# Altium PCB IOT_Buttons.PcbDoc (part 2 of 2)
Units mil, origin at the board's own origin, x right, y up, seen from the top; angles counter-clockwise.
Board outline 2799.91 x 2755.91 mil, 2 copper layers (Top Layer, Bottom Layer), stack 57 mil thick; 76 components, 42 nets, 270 pads, 220 vias.
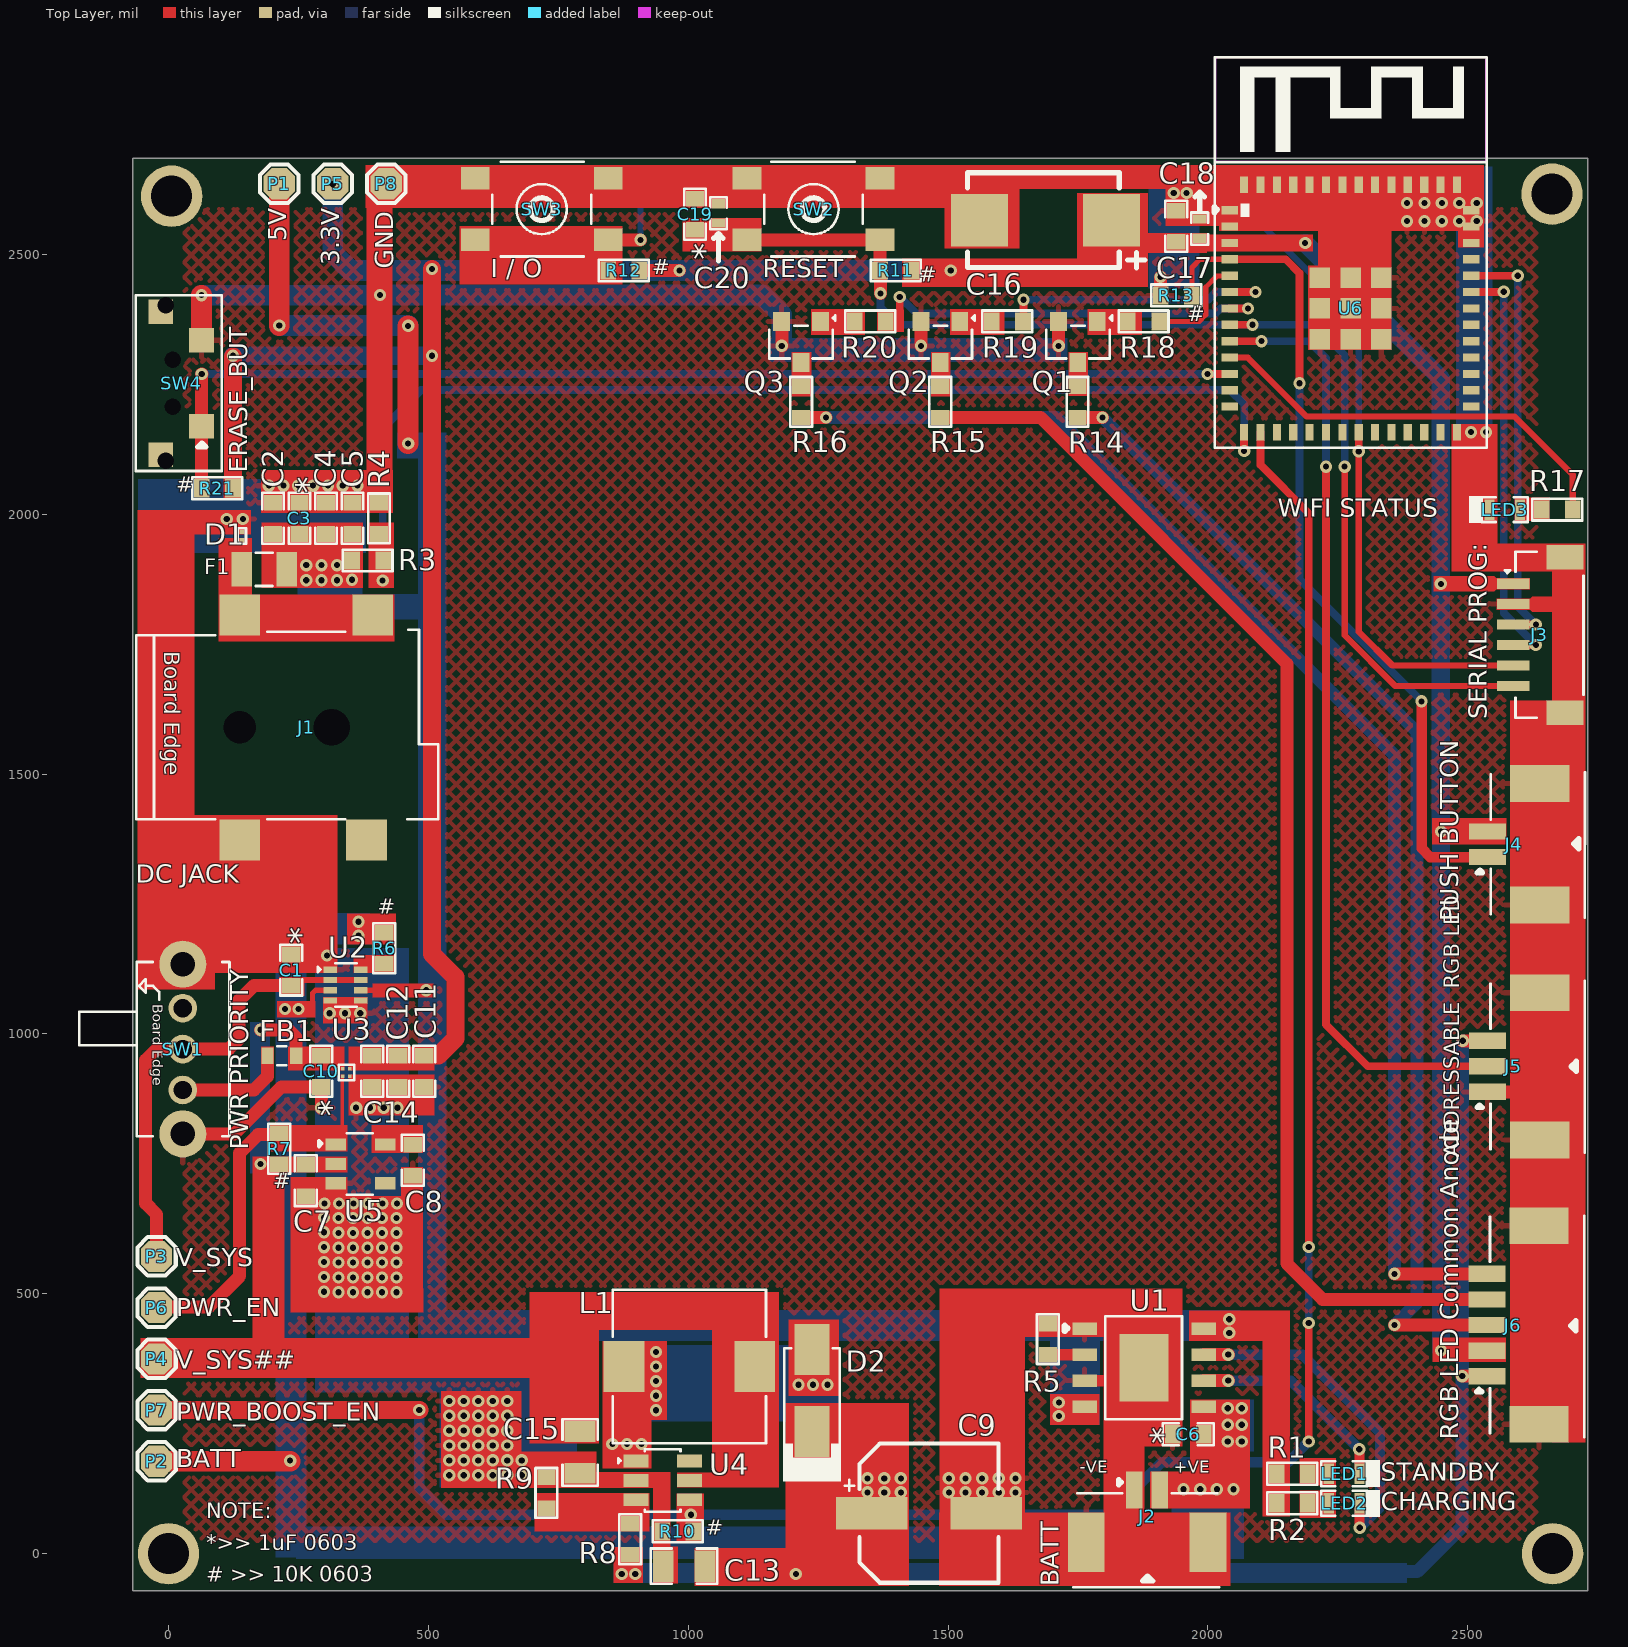
[diagram p0: Top Layer view]

## Part data (continued)
R8: library part RT0603BRD0762KL, "RES SMD 62K OHM 0.1% 1/10W 0603", Case Code (Imperial)=0603, Case Code (Metric)=1608, LCSC Part Number=C136961, Manufacturer=Yageo, Max Operating Temperature=125°C, Max Power Dissipation=100mW, Min Operating Temperature=-55°C, Package Quantity=5000, Resistance=62kR, Resistor Type="Thin Film", Supplier Part Number 1=YAG1707CT-ND, Temperature Coefficient=25ppm/°C, Tolerance=0.1%, Voltage Rating=75V, Voltage Rating (DC)=50V, Case/Package=0603, Category="Chip SMD Resistors", ComponentLink1Description=https://datasheet.ciiva.com/8888/pyu-rt-1-to-0-05-rohs-l-4-8888573.pdf?src-supplier=Avnet, ComponentLink1URL=https://datasheet.ciiva.com/8888/pyu-rt-1-to-0-05-rohs-l-4-8888573.pdf?src-supplier=Avnet, ComponentLink2Description=https://datasheet.ciiva.com/2586/pyu-rt-1-to-0-05-rohs-l-4-2586028.pdf?src-supplier=Digi-Key, ComponentLink2URL=https://datasheet.ciiva.com/2586/pyu-rt-1-to-0-05-rohs-l-4-2586028.pdf?src-supplier=Digi-Key, ComponentLink3Description=https://datasheet.ciiva.com/46635/pyu-rt-1-to-0-05-rohs-l-5-46635035.pdf?src-supplier=Digi-Key, ComponentLink3URL=https://datasheet.ciiva.com/46635/pyu-rt-1-to-0-05-rohs-l-5-46635035.pdf?src-supplier=Digi-Key, Construction=Rectangular, Contact Plating=Tin,Matte, Depth=0.8mm, Features="Moisture Resistant", Height=0.022inch, Item Type=Resistor, Lead Free="Lead Free", Length=1.6mm, Manufacturer Part Number=RT0603BRD0762KL, Military Standard=Not, Number of Terminations=2, Packaging="Tape and Reel", Power Rating=100mW, Pricing 1="1=0.34000, 10=0.28800, 100=0.11260, 500=0.06812, 1000=0.04716, 2500=0.04322 (USD)", Radiation Hardening=No, RoHS=Yes, RoHS Compliant=Yes, Series=RT, Stock 1=20000, Supplier 1=Digi-Key, Termination=SMD/SMT, Weight=7.1E-05oz, Width=0.8mm
R9: library part RT0603BRD073K16L, "RES SMD 3.16KOHM 0.1% 1/10W 0603", Case Code (Imperial)=0603, Case Code (Metric)=1608, LCSC Part Number=C861373, Manufacturer=Yageo, Max Operating Temperature=125°C, Max Power Dissipation=100mW, Min Operating Temperature=-55°C, Package Quantity=5000, Resistance=3.16kR, Resistor Type="Thin Film", Temperature Coefficient=25ppm/°C, Tolerance=0.1%, Voltage Rating=75V, Voltage Rating (DC)=50V, Case/Package=0603, Category="Chip SMD Resistors", ComponentLink1Description=https://datasheet.ciiva.com/2585/pyu-rt-1-to-0-05-rohs-l-5-2585923.pdf?src-supplier=Digi-Key, ComponentLink1URL=https://datasheet.ciiva.com/2585/pyu-rt-1-to-0-05-rohs-l-5-2585923.pdf?src-supplier=Digi-Key, Construction=Rectangular, Depth=0.8mm, Height=0.022inch, Item Type=Resistor, Lead Free="Lead Free", Length=0.063inch, Manufacturer Part Number=RT0603BRD073K16L, Military Standard=Not, Number of Terminations=2, Packaging="Tape and Reel", Power Rating=100mW, Pricing 1="1=0.31330, 10=0.25380, 25=0.25120, 100=0.09580, 250=0.09480, 500=0.09380, 1000=0.05630, 3000=0.03310 (USD)", RoHS=Yes, RoHS Compliant=Yes, Series=RT, Stock 1=4487, Supplier 1="Arrow Electronics", Supplier Part Number 1=RT0603BRD073K16L, Termination=SMD/SMT, Width=0.031inch
R14 R15 R16: library part RC0603JR-070RL, "RES 0 OHM JUMPER 1/10W 0603", Case Code (Imperial)=0603, Case Code (Metric)=1608, LCSC Part Number=C95177, Manufacturer=Yageo, Max Operating Temperature=155°C, Max Power Dissipation=100mW, Min Operating Temperature=-55°C, Package Quantity=5000, Resistance=0mR, Resistance Tolerance=5%, Resistor Type="Thick Film", Supplier Part Number 1=311-0.0GRCT-ND, Temperature Coefficient=200ppm/°C, Tolerance=1%, Voltage Rating=50V, Case/Package=0603, Category="Chip SMD Resistors", Construction=Rectangular, Contact Plating=Tin,Matte, Depth=0.8mm, Features="Moisture Resistant", Height=0.45mm, Item Type=Resistor, Lead Free="Lead Free", Length=1.6mm, Manufacturer Part Number=RC0603JR-070RL, Military Standard=Not, Number of Pins=2, Number of Terminations=2, Packaging="Tape and Reel", Power Rating=100mW, Pricing 1="1=0.10000, 10=0.01700, 25=0.01240, 50=0.00960, 100=0.00700, 250=0.00536, 500=0.00430, 1000=0.00316 (USD)", Radiation Hardening=No, Reach SVHC Compliant="No SVHC", RoHS=Yes, RoHS Compliant=Yes, Series=RC, Size Code=0603, Stock 1=18081776, Supplier 1=Digi-Key, Technology="THICK FILM", Termination=SMD/SMT, Voltage Rating (DC)=50V, Width=0.8mm
R17: library part RC0603FR-0751RL, "RES SMD 51R 100mW 0603", Case Code (Imperial)=0603, Case Code (Metric)=1608, LCSC Part Number=C114628, Manufacturer=Yageo, Max Operating Temperature=155°C, Max Power Dissipation=100mW, Min Operating Temperature=-55°C, Package Quantity=1, Resistance Tolerance=1%, Resistor Type="Thick Film", Temperature Coefficient=100ppm/°C, Voltage Rating=75V, Voltage Rating (DC)=50V, Case/Package=0603, Category="Chip SMD Resistors", ComponentLink1Description=https://datasheet.ciiva.com/11808/0900766b80f96399-11808142.pdf?src-supplier=RSComponents, ComponentLink1URL=https://datasheet.ciiva.com/11808/0900766b80f96399-11808142.pdf?src-supplier=RSComponents, ComponentLink2Description=https://datasheet.ciiva.com/46395/443971-46395015.pdf?src-supplier=Element14, ComponentLink2URL=https://datasheet.ciiva.com/46395/443971-46395015.pdf?src-supplier=Element14, ComponentLink3Description=https://datasheet.ciiva.com/2454/pyu-r-int-thick-7-2454445.pdf?src-supplier=Digi-Key, ComponentLink3URL=https://datasheet.ciiva.com/2454/pyu-r-int-thick-7-2454445.pdf?src-supplier=Digi-Key, ComponentLink4Description=https://datasheet.ciiva.com/2454/pyu-r-int-thick-7-2454446.pdf?src-supplier=Digi-Key, ComponentLink4URL=https://datasheet.ciiva.com/2454/pyu-r-int-thick-7-2454446.pdf?src-supplier=Digi-Key, ComponentLink5Description=https://datasheet.ciiva.com/2454/pyu-r-int-thick-7-2454444.pdf?src-supplier=Digi-Key, ComponentLink5URL=https://datasheet.ciiva.com/2454/pyu-r-int-thick-7-2454444.pdf?src-supplier=Digi-Key, Contact Plating=Tin,Matte, Depth=0.8mm, Features="Moisture Resistant", Height=0.45mm, Lead Free="Lead Free", Length=1.6mm, Manufacturer Part Number=RC0603FR-0751RL, Number of Terminations=2, Packaging="Tape and Reel", Power Rating=100mW, Pricing 1="5000=0.00260, 10000=0.00240, 25000=0.00210, 50000=0.00180 (USD)", REACH SVHC="No SVHC", Resistance=51R, RoHS=Yes, RoHS Compliant=Yes, Series=RC, Size Code=0603, Stock 1=70000, Supplier 1="Arrow Electronics", Supplier Part Number 1=RC0603FR-0751RL, Technology="THICK FILM", Termination=SMD/SMT, Tolerance=1%, Weight=7.1E-05oz, Width=0.8mm
R18 R19 R20: library part RC0603JR-071KL, "RES SMD 1K 0.1W 0603  75 V, Thick Film", Case Code (Imperial)=0603, Case Code (Metric)=1608, LCSC Part Number=C14676, Manufacturer=Yageo, Max Operating Temperature=155°C, Min Operating Temperature=-55°C, Package Quantity=5000, Power Rating=100mW, Resistance=1kR, Resistance Tolerance=5%, Resistor Type="Thick Film", Supplier Part Number 1=311-1.0KGRCT-ND, Temperature Coefficient=100ppm/°C, Voltage Rating=50V, Body Length=1.6mm, Case/Package=0603, Category="Chip SMD Resistors", Construction=Rectangular, Contact Plating=Tin,Matte, Depth=0.8mm, Height=0.45mm, Lead Free="Lead Free", Length=1.6mm, Manufacturer Part Number=RC0603JR-071KL, Military Standard=Not, Number of Pins=2, Packaging="Tape and Reel", Pricing 1="1=0.10000, 10=0.02000, 100=0.00800, 1000=0.00360, 2500=0.00312 (USD)", Radiation Hardening=No, REACH SVHC=Unknown, RoHS=Yes, RoHS Compliant=Yes, Series=RC, Size Code=0603, Stock 1=1727570, Supplier 1=Digi-Key, Termination=SMD/SMT, Tolerance=5%, Voltage Rating (DC)=50V, Width=0.8mm
SW1: "Lying 1A SPDT 9.6mm 8.6mm 24V 3.6mm Black PCPin 10000 Rectangular columnar -25℃~+70℃ Plugin Slide Switches ROHS", LCSC Part Number=C2848877, Manufacturer=G-Switch, Package=Custom, ComponentLink1Description=LCSC, ComponentLink1URL=https://www.lcsc.com/product-detail/Slide-Switches_G-Switch-SK-12D29-G060_C2848877.html, Item Type="Slide Switch", Manufacturer Part Number=SK-12D29-G060
SW2 SW3: "No NO 50mA 4.5mm 100000 260gf 12V -30℃~+85℃ 4.5mm 4.3mm Black Round Button Brick nogging SPST SMD Tactile Switches ROHS", LCSC Part Number=C381037, Manufacturer="XKB Connectivity", Package=Custom, ComponentLink1Description=LCSC, ComponentLink1URL=https://www.lcsc.com/product-detail/Tactile-Switches_XKB-Connectivity-TS-1109S-C-B_C381037.html, Item Type=Switch, Manufacturer Part Number=TS-1109S-C-B
SW4: "-20℃~+85℃ SMDSplicing Black Rectangle button 50mA Surface Mount SPST 100MΩ 100000 250gf@±50gf 12V SMD Tactile Switches ROHS", LCSC Part Number=C589180, Manufacturer="RI SHENG", ComponentLink1Description=LCSC, ComponentLink1URL=https://www.lcsc.com/product-detail/Tactile-Switches_RI-SHENG-ST-1112RA-P_C589180.html, Manufacturer Part Number=ST-1112RA-P
U1: "ESOP-8 Battery Management ICs ROHS", LCSC Part Number=C16581, Manufacturer=TOPPOWER, Package=ESOP-8, ComponentLink1Description=LCSC, ComponentLink1URL=https://www.lcsc.com/product-detail/Battery-Management-ICs_TOPPOWER-Nanjing-Extension-Microelectronics-TP4056-42-ESOP8_C16581.html, Item Type=Mosfet, Manufacturer Part Number=TP4056-42-ESOP8
U2: "OR Controller N+1 ORing Controller N-Channel 2:1 SOT-583", LCSC Part Number=C3235556, Manufacturer="Texas Instruments", Supplier Part Number 1=595-LM66200DRLR, Category="Integrated Circuits (ICs)", Item Type=IC, Manufacturer Part Number=LM66200DRLR, Pricing 1="1=0.80000, 10=0.70000, 50=0.65800, 100=0.53700, 1000=0.34000, 10000=0.30700 (USD)", RoHS=No, Stock 1=11717, Supplier 1=Mouser
U3: "500-MA, LOW-NOISE, LOW-IQ, HIGH", LCSC Part Number=C3019997, Manufacturer="Texas Instruments", Package=Custom, ComponentLink1Description=LCSC, ComponentLink1URL=https://www.lcsc.com/product-detail/Linear-Voltage-Regulators-LDO_Texas-Instruments-TPS7A2133PYWDJ_C3019997.html, Item Type=IC, Manufacturer Part Number=TPS7A2133PYWDJ
U4: "boost converterType 1 Boost 28V 2V~24V 1.2MHz SOT-23-6 DC-DC Converters ROHS", LCSC Part Number=C84817, Manufacturer="XI'AN Aerosemi Tech", Package=SOT-23-6, ComponentLink1Description=LCSC, ComponentLink1URL=https://www.lcsc.com/product-detail/DC-DC-Converters_XI-AN-Aerosemi-Tech-MT3608_C84817.html, Item Type=IC, Manufacturer Part Number=MT3608
U5: "Power Supply Support Circuit, Fixed, 1 Channel, +3.1V, CMOS, PDSO5", Case/Package=LSSOP, LCSC Part Number=C253184, Manufacturer=Rohm, Max Operating Temperature=125°C, Min Operating Temperature=-25°C, Nominal Supply Voltage=2.4V, Package Body Material=Plastic, Package Equivalence Code=TSOP5/6,.11,37, Package Shape=Rectangular, Package Style="SMALL OUTLINE, LOW PROFILE, SHRINK PITCHMeter", Power Supplies=1.8/5V, Supplier Part Number 1=755-BU4231G-TR, Temperature Grade=OTHER, Threshold Voltage-Nom=3.1V, Adjustable Threshold=No, Category="Voltage Supervisors", Channels=1, ComponentLink1Description=https://datasheet.ciiva.com:443/pdfs/VipMasterIC/IC/ROHM/ROHMS33934/ROHMS34686-1.pdf?src-supplier=IHS+Markit, ComponentLink1URL=https://datasheet.ciiva.com:443/pdfs/VipMasterIC/IC/ROHM/ROHMS33934/ROHMS34686-1.pdf?src-supplier=IHS+Markit, ComponentLink2Description=https://datasheet.ciiva.com/6601/bu42xxg-e-6601781.pdf?src-supplier=Digi-Key, ComponentLink2URL=https://datasheet.ciiva.com/6601/bu42xxg-e-6601781.pdf?src-supplier=Digi-Key, ComponentLink3Description=https://datasheet.ciiva.com/6601/bu42xxg-e-6601782.pdf?src-supplier=Digi-Key, ComponentLink3URL=https://datasheet.ciiva.com/6601/bu42xxg-e-6601782.pdf?src-supplier=Digi-Key, ComponentLink4Description=https://datasheet.ciiva.com/6601/bu42xxg-e-6601784.pdf?src-supplier=Digi-Key, ComponentLink4URL=https://datasheet.ciiva.com/6601/bu42xxg-e-6601784.pdf?src-supplier=Digi-Key, ComponentLink5Description=https://datasheet.ciiva.com/22735/1747282-22735962.pdf?src-supplier=Element14, ComponentLink5URL=https://datasheet.ciiva.com/22735/1747282-22735962.pdf?src-supplier=Element14, ComponentLink6Description=https://datasheet.ciiva.com/15105/getdatasheetpartid-450589-15105309.pdf?src-supplier=Verical, ComponentLink6URL=https://datasheet.ciiva.com/15105/getdatasheetpartid-450589-15105309.pdf?src-supplier=Verical, Height - Seated (Max)=1.25mm, Item Type=IC, JESD-30 Code=R-PDSO-G5, Length=2.9mm, Manufacturer Part Number=BU4231G-TR, Moisture Sensitivity Level=1, Number of Channels=1, Pins=5, Pricing 1="1=0.63000, 10=0.53400, 50=0.53400, 100=0.37000, 1000=0.24200, 10000=0.22000 (USD)", Qualification Status="Not Qualified", Reach SVHC Compliant=Yes, RoHS=Yes, RoHS Compliant=Yes, Stock 1=3336, Supplier 1=Mouser, Surface Mount=Yes, Technology=CMOS, Terminal Form="Gull Wing", Terminal Pitch=0.95mm, Terminal Position=DUAL, Throw Configuration="POWER SUPPLY SUPPORT CIRCUIT", Width=1.6mm
U6: "SMD MODULE W/PCB ANT ESP-U4WDH", LCSC Part Number=C2980305, Manufacturer="Espressif Systems", Supplier Part Number 1=356-ESP32-MINI1PH3Q0, ComponentLink1Description=LCSC, ComponentLink1URL=https://www.lcsc.com/product-detail/WiFi-Modules_Espressif-Systems-ESP32-MINI-1-N4_C2980305.html, Item Type=Module, Manufacturer Part Number=ESP32-MINI-1-N4, Pricing 1="1=2.48000, 10=2.48000, 50=2.48000, 100=2.48000, 1000=2.48000, 10000=2.48000 (USD)", RoHS=No, Stock 1=5903, Supplier 1=Mouser

## Free pads (board coordinates)
  round 118.11 hole 78.74: MH(0,0) MH(6,2612) MH(2662,2616) MH(2663,0)

## Via types
v1: diameter 23.62, hole 11.81, Top Layer to Bottom Layer, 220 vias

## Nets (pads, with @x,y where several pads share a name; then routed paths per layer and width w, separated by ;. In a path a pad name is that pad's centre, name@x,y a point inside that pad or via, vN(x,y) a via of type N, cw(c..) or ccw(c..) an arc to the next point about the centre after c; other vN are vias at no path point)
3.3V: C11.1 C12.1 C14.1 C16.1 C17.1 C18.1 J3.1 J4.2 J6.2 P5.1 R11.2 R12.1 R21.1 U3.A2 U6.3 | length 6064.1
  Top Layer w25: R12.1 v1(983,2469) ; C16.1@1794.33,2527.67 1831.67,2565 1836,2565 1836,2522.5 1804.32,2522.5 C16.1@1798.32,2516.5
  Top Layer w35: R21.1 v1@124,2303 ; C12.1@429,953 434.5,958.5 519.5,958.5 552,991 552,1109 507,1154 v1(507,2305) v1(507,2472)
  Bottom Layer w35: v1(124,2305) v1(507,2305) ; v1(2187,2522) 2448,2261 v1(2448,1866) 2448,1389.74 v1(2448.13,1389.61) ; v1(2448.13,390.79) v1@2448.13,1388.12
  Bottom Layer w40: v1(316,2635) 316,2503 350,2469 v1(983,2469) v1(1505,2469)
5V: C2.1 C3.1 C4.1 C5.1 F1.2 P1.1 R1.2 R2.2 R3.2 U1.4 U1.8 U2.6 | length 1614.3
  Top Layer w10: U2.6 369.71,1084.08 495.92,1084.08 v1(496,1084)
  Top Layer w25: v1@1713,290 1715,288 1757.49,288 U1.4 ; R2.2 R1.2
  Top Layer w40: v1(213,2363) P1.1 ; v1(461,2136) v1@461,2362
  Bottom Layer w40: v1(213,2363) v1@460.5,2363 ; 500,1795 507.31,1787.69 507.31,1281.6 ; 514,448.7 529.7,433 548,433 ; 1964,433 v1@2039,433
  other v1: 1713,265 1713,291 2041,425 2041,451 265,1873 294.5,1873 324,1873 353,1874 265,1902 294.5,1902 324,1902 461,2362.5
5V#: D1.1 F1.1 J1.1 | length 0.4
  Top Layer w10: F1.1 F1.1@141,1894.31
ADDR_RGB: J5.2 U6.9 | length 1824.5
  Top Layer w15: U6.9 v1(2103,2333) ; v1(2227,2091.58) 2227,1018 2307.27,937.73 J5.2
  Bottom Layer w15: v1(2103,2333) 2194,2333 2227,2300 v1(2227,2091.58)
BATT: C6.1 J2.2 P2.1 R6.2 U1.5 U2.3 | length 935.2
  Top Layer w10: v1@246,1048 v1(250,1048) 271.14,1048 277,1053.86 277,1078.3 282.86,1084.16 U2.3
  Top Layer w25: v1@362,1195 R6.2
  Top Layer w40: P2.1 v1@234,177.86
  Bottom Layer w40: 234,27 245,16 ; 235.5,603 235.5,197.5 245,188 ; v1(1953,124) v1(1985,124) v1(2017,124) v1(2049,124)
  other v1: 234,179 2038,216 2065,216 2038,248 2065,248 2038,280 2065,280 224,1048 365.51,1189 365.51,1216
BLUE: J6.5 R16.2 | length 2586.4
  Top Layer w25: R16.2 v1(1265,2186) ; v1(2359,538.43) J6.5
  Bottom Layer w25: v1(1265,2186) 1709,2186 2359,1536 v1(2359,538.43)
BLUE_EN: R20.2 U6.7 | length 785.4
  Top Layer w15: R20.2 1380,2373.5 R20.2@1384,2377.5 ; R20.2@1389,2372.5 1392.5,2376 1396.5,2376 1407,2386.5 v1(1407,2418) ; U6.7 v1(2077,2396)
  Bottom Layer w15: v1(1407,2418) 1438.48,2386.52 2014.52,2386.52 2024,2396 v1(2077,2396)
BOOST_V: C9.1 C13.1 D2.1 J5.3 J6.1 R8.1 | length 2376.1
  Top Layer w25: v1(2489.13,341.57) J6.1 ; v1(2490.13,986.94) J5.3
  Bottom Layer w25: v1(872,-39) v1(898,-39) ; v1(1207,-39) 1211.43,-34.57 2402.43,-34.57 2489.13,52.13 v1(2489.13,341.57) 2490.13,342.57 v1(2490.13,986.94)
  other v1: 1345,118 1377,118 1409,118 1345,145 1377,145 1409,145
CHRG: LED2.2 U1.7 | length 647.3
  Top Layer w20: v1@2291.53,50.47 LED2.2
  Top Layer w25: U1.7 v1(2039,383)
  Bottom Layer w20: v1(2039,383) 2181,383 2331,233 2331,89 v1(2292,50)
CHRG_CHK: R3.1 R4.1 U6.14 | length 2123.6
  Top Layer w15: v1(2069.57,2121.84) U6.14
  Top Layer w25: R4.1 407.5,1962 R4.1@410,1959.5
  Bottom Layer w15: v1(412,1872.68) 412,2165 486,2239 2042,2239 2069.57,2211.43 v1(2069.57,2121.84)
EN: C19.2 C20.2 J3.6 R11.1 SW2.3 SW2.4 U6.8 | length 2263.1
  Top Layer w12: v1(2263,2091.58) 2263,1767 2360.43,1669.57 J3.6
  Top Layer w15: U6.8 v1(2085.48,2364.52)
  Top Layer w25: SW2.3 SW2.4 ; R11.1 SW2.4 ; v1(1370,2425) R11.1@1370,2468
  Bottom Layer w15: v1(1370,2425) 1370,2398 1403.48,2364.52 v1(2085.48,2364.52) 2204.48,2364.52 2263,2306 v1(2263,2091.58)
ERASE_BUT: R21.2 SW4.1 U6.11 | length 2198.2
  Top Layer w15: v1(1999,2270) U6.11
  Top Layer w25: R21.2 63.74,2050.26 63.74,2269.74 v1(64,2270)
  Bottom Layer w15: v1(64,2270) v1(1999,2270)
FB_BOOST: R8.2 R9.2 U4.3
GND: C1.2 C2.2 C3.2 C4.2 C5.2 C6.2 C7.2 C8.1 C9.2 C10.2 C11.2 C12.2 C13.2 C14.2 C15.2 C16.2 C17.2 C18.2 C19.1 C20.1 D1.2 J1.2@137.05,1373.46 J2.1 J2.MP1 J2.MP2 J3.2 J3.MP1 J3.MP2 J4.MP1 J4.MP2 J5.1 J5.MP1 J5.MP2 J6.MP1 J6.MP2 LED3.2 P8.1 Q1.2 Q2.2 Q3.2 R4.2 R5.1 R9.1 R10.1 R13.1 SW1.4 SW1.5 SW2.1 SW2.2 SW3.3 SW3.4 SW4.2 U1.1 U1.3 U1.9 U2.1 U2.4 U2.5 U3.B2 U4.2 U5.3 U6.1 U6.2 U6.27 U6.38 U6.39 U6.40 U6.41 U6.42 U6.43 U6.44 U6.45 U6.46 U6.47 U6.48 U6.49 U6.50 U6.51 U6.52 U6.53 U6.54 U6.55 U6.56 U6.57 U6.58 U6.59 U6.60 U6.61 U6.62 U6.63 | length 2898.9
  Top Layer w15: 127.5,1983 135.5,1991 v1(143,1991) ; v1@2500,2158 2505,2158 2506,2159 2534,2159 v1(2535,2158)
  Top Layer w22: U1.3 U1.9@1852,333
  Top Layer w25: SW1.5 126.61,807.61 217,898 C10.2 v1(294,858) v1@294,857 ; Q3.2 1179.6,2365.79 1180,2365.39 v1(1180,2324) ; v1(1448,2324) Q2.2@1448,2365.39 ; v1(1712.6,2324) Q1.2@1712.6,2365.39 ; v1(1908.73,2456.27) 1908.73,2421.27 R13.1 ; J5.1 2655.48,888.52
  Top Layer w40: SW4.2 v1(63.48,2421.52) ; U1.9@1852,333 U1.9
  Top Layer w50: 406,2067.33 P8.1@406,2636 ; SW2.2 SW2.1@1357.06,2646.06 ; 1858,43 1858.18,43.18
  Bottom Layer w40: v1(63.48,2421.52) v1@406.52,2421.52 ; v1(407,2422) 1142,2422 1180,2384 v1(1180,2324)
  other v1: 1501.47,118 1533.47,118 1565.47,118 1597.47,118 1629.47,118 1501.47,145 1533.47,145 1565.47,145 1597.47,145 1629.47,145 540,151 567.92,151 595.83,151 623.75,151 651.67,151 679.58,151 540,179.6 567.92,179.6 595.83,179.6 623.75,179.6 651.67,179.6 679.58,179.6 540,208.2 567.92,208.2 595.83,208.2 623.75,208.2 651.67,208.2 540,236.8 567.92,236.8 595.83,236.8 623.75,236.8 651.67,236.8 540,265.4 567.92,265.4 595.83,265.4 623.75,265.4 651.67,265.4 540,294 567.92,294 595.83,294 623.75,294 651.67,294 327,503 354.92,503 382.83,503 410.75,503 438.67,503 299,504 327,531.6 354.92,531.6 382.83,531.6 410.75,531.6 438.67,531.6 299,532.6 327,560.2 354.92,560.2 382.83,560.2 410.75,560.2 438.67,560.2 299,561.2 327,588.8 354.92,588.8 382.83,588.8 410.75,588.8 438.67,588.8 299,589.8 327,617.4 354.92,617.4 382.83,617.4 410.75,617.4 438.67,617.4 299,618.4 327,646 354.92,646 382.83,646 410.75,646 438.67,646 299,647 300,674 327.92,674 355.83,674 383.75,674 411.67,674 439.58,674 361,858 387.5,858 414,858 440.5,858 310,1040 339.5,1040 369,1040 305,1151 112,1991 193,2055 221.43,2055 249.86,2055 278.29,2055 306.72,2055 335.15,2055 363.58,2055 2506,2158 2383,2564 2416.5,2564 2450,2564 2483.5,2564 2517,2564 2383,2599 2416.5,2599 2450,2599 2483.5,2599 2517,2599 1934,2618 1958.96,2617.96
GREEN: J6.4 R15.2 | length 2430.5
  Top Layer w25: R15.2 1678,2186 2152,1712 2152,558 2220.79,489.21 J6.4
GREEN_EN: R19.2 U6.6 | length 542.9
  Top Layer w15: R19.2@1645,2372 v1(1645,2412.83) ; U6.6 v1(2091.49,2427.51)
  Bottom Layer w15: v1(1645,2412.83) 2000.83,2412.83 2015.51,2427.51 v1(2091.49,2427.51)
IO0: J3.5 R12.2 SW3.1 SW3.2 U6.21 | length 2627.8
  Top Layer w12: v1(2290,2121) 2290.03,1773.97 2355.06,1708.94 J3.5
  Top Layer w15: v1(2290,2121) U6.21
  Top Layer w25: SW3.2 907.94,2527.94 v1(908,2528)
  Bottom Layer w12: v1(908,2528) 908,2622 942,2656 2004,2656 2290,2370 v1(2290,2121)
ISET: R5.2 U1.2 | length 70.5
  Top Layer w22: R5.2 U1.2
NetC8_2: C8.2 U5.5
NetLED1_1: LED1.1 R1.1
NetLED2_1: LED2.1 R2.1
NetLED3_1: LED3.1 R17.1
NetQ1_1: Q1.1 R18.1
NetQ1_3: Q1.3 R14.1 | length 0.8
  Top Layer w20: R14.1 R14.1@1749.3,2246.3 ; Q1.3@1749.3,2291.96 Q1.3
NetQ2_1: Q2.1 R19.1
NetQ2_3: Q2.3 R15.1
NetQ3_1: Q3.1 R20.1
NetQ3_3: Q3.3 R16.1
PUSH_BUT: J4.1 R13.2 U6.4 | length 1616.7
  Top Layer w10: R13.2 1969,2475 1984.5,2490.5 U6.4
  Top Layer w15: U6.4 2149.5,2490.5 2176,2464.01 v1(2176,2252)
  Top Layer w20: v1(2411,1640) 2411,1357 2427.61,1340.39 J4.1
  Bottom Layer w15: v1(2176,2252) 2176,1875 v1(2411,1640)
PWR_BOOST_EN: P7.1 R10.2 U4.4 U6.15 | length 4427
  Top Layer w15: U6.15 2101.06,2094.94 2194,2002 v1(2194,590) ; v1(2194,216) v1(2194,444)
  Top Layer w35: P7.1 v1(482.39,276.39)
  Bottom Layer w15: v1(2194,444) v1(2194,590)
  Bottom Layer w20: v1(482.39,276.39) 482.39,126.61 534,75 v1(1005,75) 1810,75 1911,176 2154,176 v1(2194,216)
PWR_EN: P6.1 R7.1 U3.B1 U5.1 | length 510.3
  Top Layer w25: P6.1@-20.06,474.93 77.93,474.93 137,534 137,771 172.5,806.5 210.5,806.5 R7.1
RED: J6.3 R14.2 | length 2240
  Top Layer w25: R14.2 v1(1797,2186) ; v1(2359,440) J6.3
  Bottom Layer w25: v1(1797,2186) 2402,1581 2402,483 v1(2359,440)
RED_EN: R18.2 U6.5 | length 203.5
  Top Layer w10: R18.2 1983,2371 1995.73,2383.73 1995.73,2436.73 2017.59,2458.59 2041.58,2458.59 U6.5
RXD: J3.4 U6.35 | length 811.2
  Top Layer w15: U6.35 v1@2569,2427.51 ; J3.4 v1(2630.78,1748.31)
  Bottom Layer w15: v1(2569,2428) 2569,1810.09 v1(2630.78,1748.31)
ST_LM: R6.1 U2.8
STDBY: LED1.2 U1.6 | length 400.8
  Top Layer w20: LED1.2 v1@2291.53,200.53
  Top Layer w25: U1.6 v1(2039,333)
  Bottom Layer w20: v1(2039,333) 2159.06,333 v1(2291.06,201)
SW_BOOST: D2.2 L1.1 U4.1 | length 68.9
  Top Layer w35: D2.2 1239,391.74 v1@1239,324.26
  other v1: 854,211 882,211 910,211 938,276 938,304 1212,325 1240,325 1268,325 938,332 938,360 938,388
TXD: J3.3 U6.36 | length 818.6
  Top Layer w15: U6.36 v1(2596.01,2459.01) ; J3.3 v1(2630.78,1787.68)
  Bottom Layer w15: v1(2596.01,2459.01) 2596.01,1822.45 v1@2630.74,1787.72
V_SYS: C1.1 P3.1 SW1.2 U2.2 U2.7 | length 769.3
  Top Layer w25: P3.1 -23.06,653.06 -44,674 -44,950 -23,971 SW1.2 116,971 136,991 136,1065 164,1093 C1.1
V_SYS#: FB1.2 SW1.3 | length 213.3
  Top Layer w25: SW1.3 164.26,892.26 190.44,918.44 FB1.2
V_SYS##: C7.1 C10.1 C15.1 FB1.1 L1.2 P4.1 R7.2 U3.A1 U4.5 U5.2 | length 329.1
  Top Layer w25: P4.1 142.93,374.93 178,410 ; v1(177,1008) 230.91,1008 245.56,993.36 FB1.1 ; R7.2@210.5,746.5 R7.2
  other v1: 177,750
WIFI_STAT: R17.2 U6.10 | length 820.4
  Top Layer w12: U6.10 2076.47,2301.53 2190,2188 2590,2188 2702,2076 R17.2
pads on no net: J1.2@137.05,1590 J1.3 SW1.1 SW4.3 SW4.4 SW4.MH U4.6 U5.4 U6.12 U6.13 U6.16 U6.17 U6.18 U6.19 U6.20 U6.22 U6.23 U6.24 U6.25 U6.26 U6.28 U6.29 U6.30 U6.31 U6.32 U6.33 U6.34 U6.37

## Polygon pours and split planes (outlines as drawn)
GND on Bottom Layer "GND_L02_P001" (hatched 45Degree grid 20 track 8, remove dead copper, pour order 1): 31,25 2632,25 2632,2587 31,2587
GND on Top Layer "GND_L01_P000" (hatched 45Degree grid 20 track 8, remove dead copper, pour order 0): 31,25 2632,25 2632,2587 31,2587

## Other copper
Top Layer:
  rectangle net BOOST_V: 856,-56 913,13
  rectangle net 5V: 392,1070 510,1097
  rectangle net V_SYS##: 162,338 223,764
  rectangle net BATT: 209,1032 283,1063
  region net GND: 325,1421 -60,1421 -60,1117 325,1117
  rectangle net SW_BOOST: 862,257 959,409
  rectangle net SW_BOOST: 1193,303 1290,451
  rectangle net SW_BOOST: 835,164 929,409
  rectangle net BATT: 343,1172 438,1232
  region net 5V: 2158,468 1963,468 1963,409 2158,409
  rectangle net 5V: 1696,248 1791,307
  region net 5V: 2158,72 2158,454 2105,454 2105,72
  region net BATT: 2081,96 2081,296.46 1965.71,296.46 1965.71,96
  rectangle net BOOST_V: 1012,-62 1425,11
  rectangle net GND: 524,126 679.58,313
  rectangle net GND: 1483,24 1648,510
  rectangle net BOOST_V: 1187,-13 1425,290
  rectangle net GND: 524,126 823,197
  rectangle net PWR_BOOST_EN: 977,23 1030,116
  rectangle net GND: 932,-57 980,14
  rectangle net GND: 932,-57 966,157
  rectangle net V_SYS##: 978,127 1136,156
  rectangle net GND: 720,126 965,157
  rectangle net FB_BOOST: 704,43 925,117
  rectangle net V_SYS##: 695,212 828,504
  rectangle net V_SYS##: -54,338 760,415
  rectangle net V_SYS##: 745,430 1136,504
  rectangle net V_SYS##: 1046,127 1175,504
  rectangle net 3.3V: 2431,1365 2574,1416
  region net NetQ1_3: 1769.3,2227.3 1769.3,2312.3 1731.3,2312.3 1731.3,2227.3
  region net NetQ2_3: 1505,2227 1505,2312 1467,2312 1467,2227
  region net NetQ3_3: 1237,2227 1237,2312 1199,2312 1199,2227
  rectangle net NetQ1_1: 1768.6,2345 1872.6,2395
  rectangle net NetQ2_1: 1504,2345 1608,2395
  rectangle net NetQ3_1: 1236,2345 1340,2395
  rectangle net GND: 1493,2511 1637,2603
  rectangle net GND: 235,464 491,510
  rectangle net IO0: 560,2442 873,2555
  rectangle net GND: 2212,2473 2353,2551
  rectangle net GND: 2192,2316 2353,2479
  rectangle net GND: -60,1414 50,2008
  rectangle net GND: 235,465 490,688
  region net GND: 490,744 447.17,744 447.17,657 490,657
  rectangle net V_SYS##: 166,733 344,764
  rectangle net NetC8_2: 391,771 490,825
  rectangle net GND: 235,657 344,725
  rectangle net PWR_EN: 195,774 344,825
  rectangle net PWR_EN: 331,774 338,922
  rectangle net GND: 346,843 512,921.78
  rectangle net NetLED2_1: 2176,69 2246,122
  rectangle net NetLED1_1: 2176,131 2246,184
  rectangle net 3.3V: 2432,369 2573,416
  rectangle net GND: 2469,1890 2726,1944
  rectangle net GND: 2469,1890 2557,2174
  rectangle net NetLED3_1: 2590,1987 2657,2032
  rectangle net GND: -60,1086 89,1134
  rectangle net V_SYS#: 178,930 203,976
  region net V_SYS##: 338.22,976 230,976 230,930 338.22,930
  rectangle net 3.3V: 346,930 512,976
  rectangle net GND: 297,1020 383,1071
  rectangle net ST_LM: 356,1117 435,1152
  rectangle net V_SYS: 213,1073 262,1102
  rectangle net V_SYS: 213,1098 383,1110
  rectangle net 3.3V: 106,2028 142,2070
  rectangle net GND: -60,1961 159,2008
  rectangle net 5V#: 96,1755 435,1846
  rectangle net CHRG_CHK: 385,1858 434,1984
  rectangle net 5V#: 96,1762 161,1954
  rectangle net BLUE_EN: 1363,2351 1415,2394
  rectangle net 3.3V: 1411,2437 1885,2492
  rectangle net 3.3V: 1781,2503 1998,2541
  rectangle net 3.3V: 1748,2437 1885,2618
  region net GND: 2695,257.68 2695,1642 2581,1642 2581,257.68
  region net BATT: 2081,158.29 1888.54,158.29 1888.54,87 2081,87
  rectangle net GND: 1502,417 1951,510
  region net GND: 1871,448 1871,206 1951.29,206 1951.29,448
  region net GND: 1799,448 1799,1 1878,1 1878,448
  region net GND: 2043,79 1482,79 1482,-62 2043,-62
  region net GND: 2726,214 2726,1944 2662,1944 2662,214
  region net 5V: 374,1888 374,1963 328,1963 328,1888
  rectangle net 5V: 179,1858 374,1984
  rectangle net GND: 178,2002 432,2085
  rectangle net GND: 379,2589 1008,2672
  rectangle net GND: 2481,2513 2531,2553.5
  rectangle net GND: 1964.15,2644.43 2531,2672
  rectangle net GND: 1918,2555 2039,2648
  rectangle net GND: 2021,2545 2531,2659.43
  rectangle net 3.3V: 1960,2506 2202,2538
  rectangle net GND: 993,2589 1637,2672
  rectangle net EN: 989,2506 1141,2570
  rectangle net GND: 1617,2626 2007,2672
  pour cut-out: 835,506 835,497 835,213 1153,213 1153,506 836,506
  region net GND: 2619.59,1816.48 2555.59,1816.48 2555.59,1837.48 2619.59,1837.48 2623.59,1841.48 2720,1841.48 2720,1812.48 2623.59,1812.48
  region net 3.3V: 2555,1877 2619,1877 2619,1856 2555,1856 2551,1852 2434,1852 2434,1881 2551,1881
Bottom Layer:
  rectangle net 5V: 339,1797 508,1847
  rectangle net 5V: 248,1797 373,1918
  rectangle net BOOST_V: 856,-56 2383.12,-18.3
  region net V_SYS##: 195,1023 157,1023 157,732 195,732
  region net BATT: 2069,-10 2069,146 1930,146 1930,-10
  region net BATT: 2067,52 245,52 245,-10 2067,-10
  region net BATT: 387.94,1232.3 206,1232.3 206,1172.3 387.94,1172.3
  region net BATT: 265,-7 265,1215 206,1215 206,-7
  rectangle net BOOST_V: 1326,101 1425,163
  rectangle net GND: 1485,102 1647,164
  rectangle net SW_BOOST: 840,195 928,402
  region net SW_BOOST: 1290,402 901,402 901,254 1290,254
  region net 5V: 535,2157.63 440,2157.63 440,2107.63 535,2107.63
  region net 5V: 534.63,410.2 534.63,2153 480,2153 480,410.2
  rectangle net 5V: 485,409.7 2062.12,468.7
  region net 5V: 1792,248 1792,456 1696.4,456 1696.4,248
  rectangle net 5V: 1696,248 1791,305
  rectangle net BATT: 2015,197 2089,297
  rectangle net GND: 521,127 786,386
  rectangle net GND: 282,310 786,388
  rectangle net GND: 2366,2545 2547,2669
  rectangle net GND: 2477,2142 2547,2669
  rectangle net GND: -59,1925 380,2068
  rectangle net GND: 282,310 463,1165
  rectangle net GND: 1156,2293 1730,2339
  rectangle net GND: 1886,2434 1984,2637

## Silkscreen, mask and mechanical layers (free items; w line width, h text height)
Top Overlay:
  lines w10: 1049,2531 1058,2540 1067,2531 ; 1058,2487 1058.08,2539 ; 1975,2611 1984,2620 ; 1984,2586 1984,2620 ; 1993,2611 1984,2620
  text "5V" at 238,2525.36 h60 r90
  text "*" at 973.35,2521 h80 r270
  text "#" at 1478,2485.46 h50 r180
  text "3.3V" at 340,2478.78 h60 r90
  text "GND" at 444,2472 h60 r90
  text "#" at 931,2452.54 h50
  text "I / O" at 620,2444 h60
  text "RESET" at 1143,2444 h60
  text "#" at 1960,2361.54 h50
  text "ERASE_BUT" at 163,2080.05 h60 r90
  text "*" at 210.35,2072 h80 r270
  text "#" at 15,2033.54 h50
  text "WIFI STATUS" at 2134,1984 h60
  text "SERIAL PROG:" at 2548,1606 h60 r90
  text "DC JACK" at -63.2,1279 h60
  text "#" at 403,1221.54 h50
  text "PUSH BUTTON" at 2493.07,1216.85 h60 r90
  text "*" at 195.35,1205 h80 r270
  text "*" at 254.35,873 h80 r270
  text "PWR PRIORITY" at 165,777.5 h60 r90
  text "ADDRESSABLE  RGB LED" at 2493,762.81 h50 r90
  text "#" at 201.12,693.5 h50
  text "V_SYS" at 14.95,542 h60
  text "PWR_EN" at 14.95,445 h60
  text "V_SYS##" at 14.95,344 h60
  text "PWR_BOOST_EN" at 14.95,244 h60
  text "*" at 1854.35,243 h80 r270
  text "RGB LED Common Anode" at 2493.04,219.32 h60 r90
  text "BATT" at 14.95,155 h60
  text "-VE" at 1753.56,148.19 h40
  text "+VE" at 1933.98,148.19 h40
  text "STANDBY" at 2332.87,129 h60
  text "CHARGING" at 2332.87,72 h60
  text "NOTE:" at 72.78,59 h50
  text "#" at 1034,26.54 h50
  text "*>> 1uF 0603" at 72.78,-2.7 h50
  text "BATT" at 1724.44,-63 h60 r90
  text "# >> 10K 0603" at 72.78,-64 h50
Dimension:
  circle w10: c1330.95,1306.95 r787.4
  lines w10: 543.6,519.6 2118.4,519.6 2118.4,2094.4 543.6,2094.4 543.6,519.6
Board Outline:
  lines w10: -69,-71 2730.91,-71 2730.91,2684.91 -69,2684.91 -69,-71 ; 1380.95,2684.91 1380.95,2684.91

## Dimensions
-69,-71 to -69,2684.91 on Dimension
2730.91,-71 to -69,-71 on Dimension
2118.4,2094.4 to 2118.4,519.6 on Dimension
543.6,2094.4 to 2118.4,2094.4 on Dimension

## Text inside footprints (layer, text, board x,y; h text height)
J1: Top Overlay "Board Edge" at -8,1736 h30 r270
SW1: Top Overlay "Board Edge" at -30.75,1056.94 h19.68 r270